# Altium PCB Studio_Clock_hv1.01_PCB_240215a.PcbDoc (part 1 of 5)
Units mm, origin at the board's own origin, x right, y up, seen from the top; angles counter-clockwise.
Board outline 360 x 60 mm, 4 copper layers (TOP, PWR, GND, BOTTOM), stack 0.547 mm thick; 257 components, 289 nets, 969 pads, 664 vias.
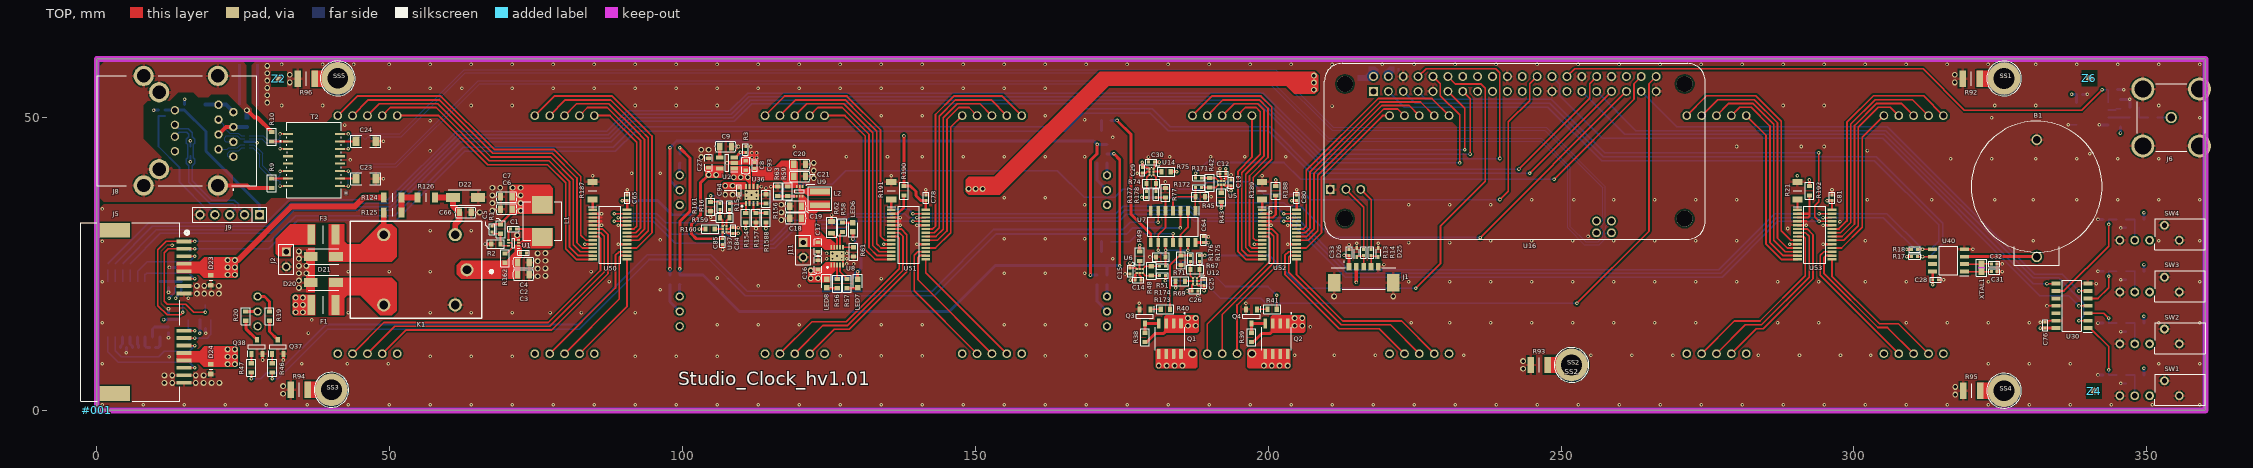
[diagram p0: TOP view]
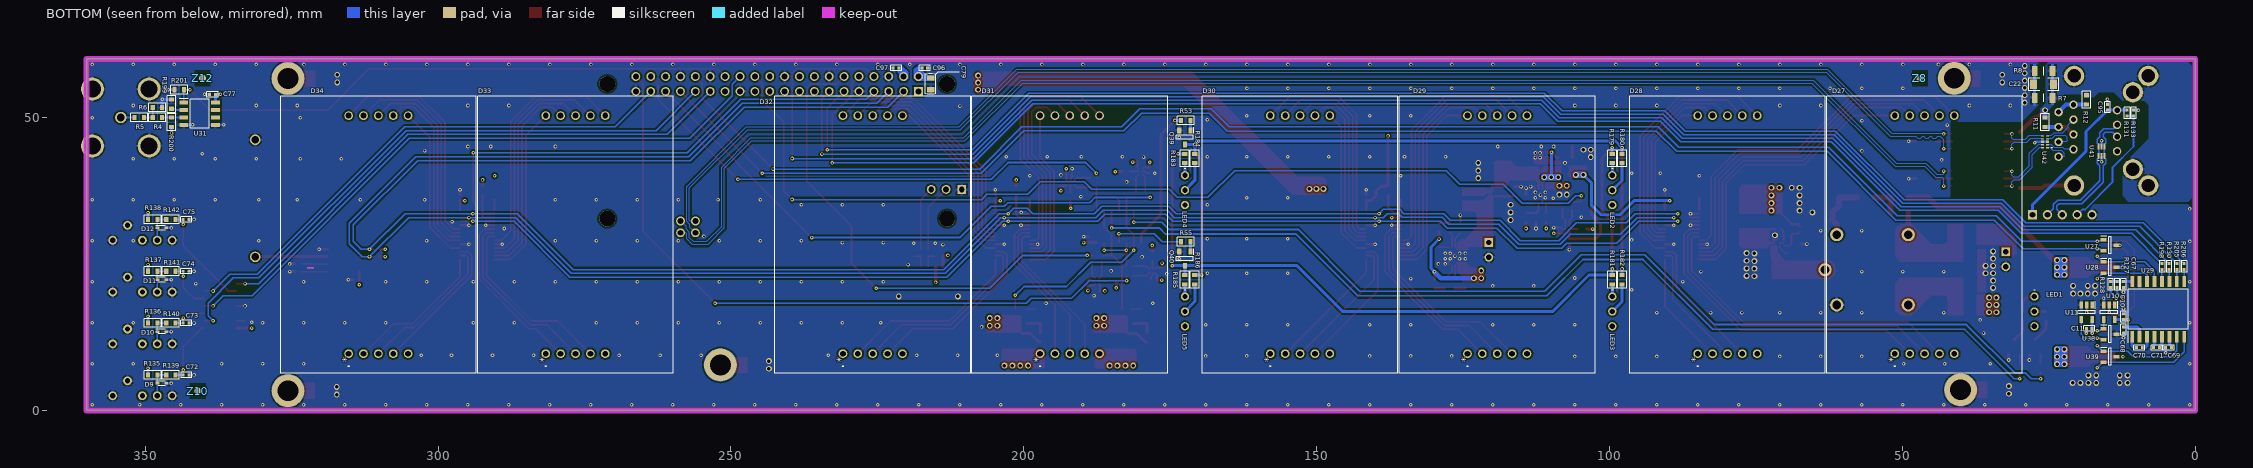
[diagram p1: BOTTOM view, seen from below]
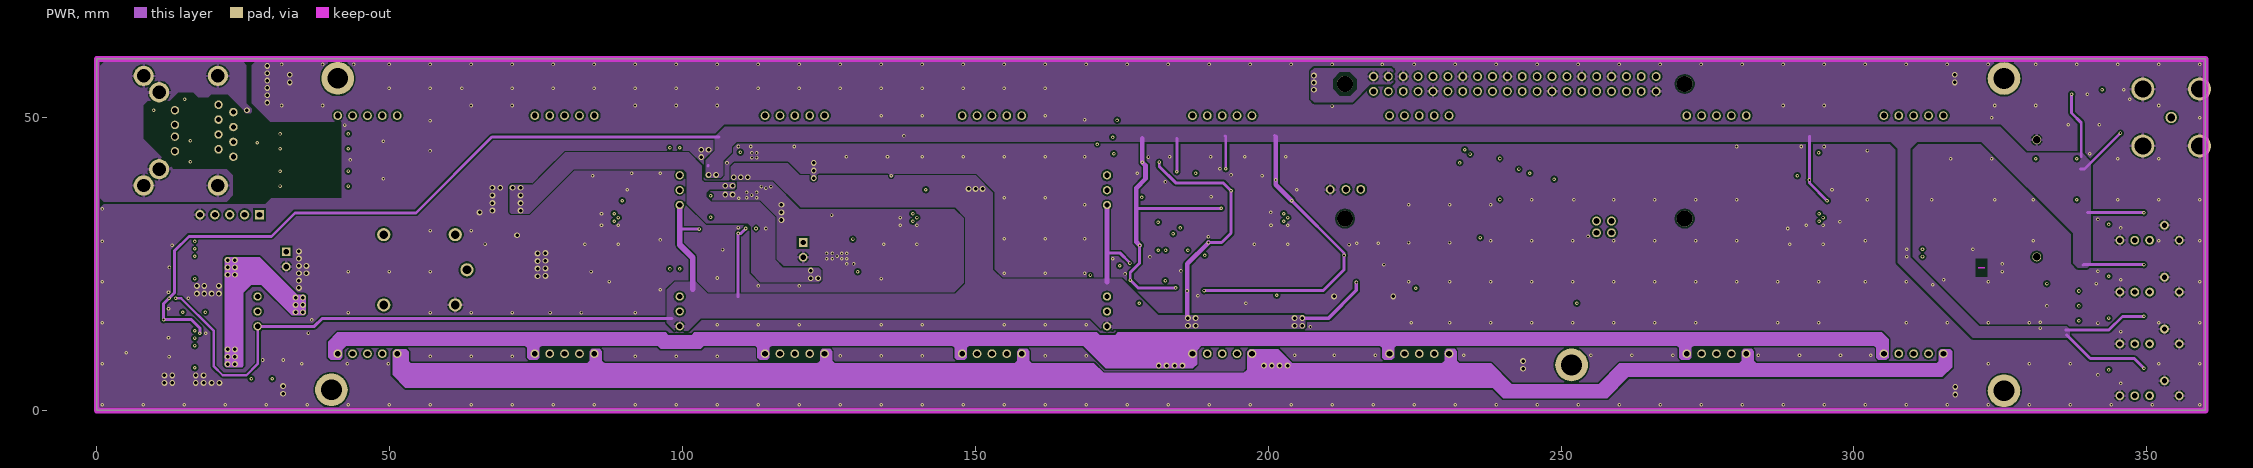
[diagram p2: PWR]
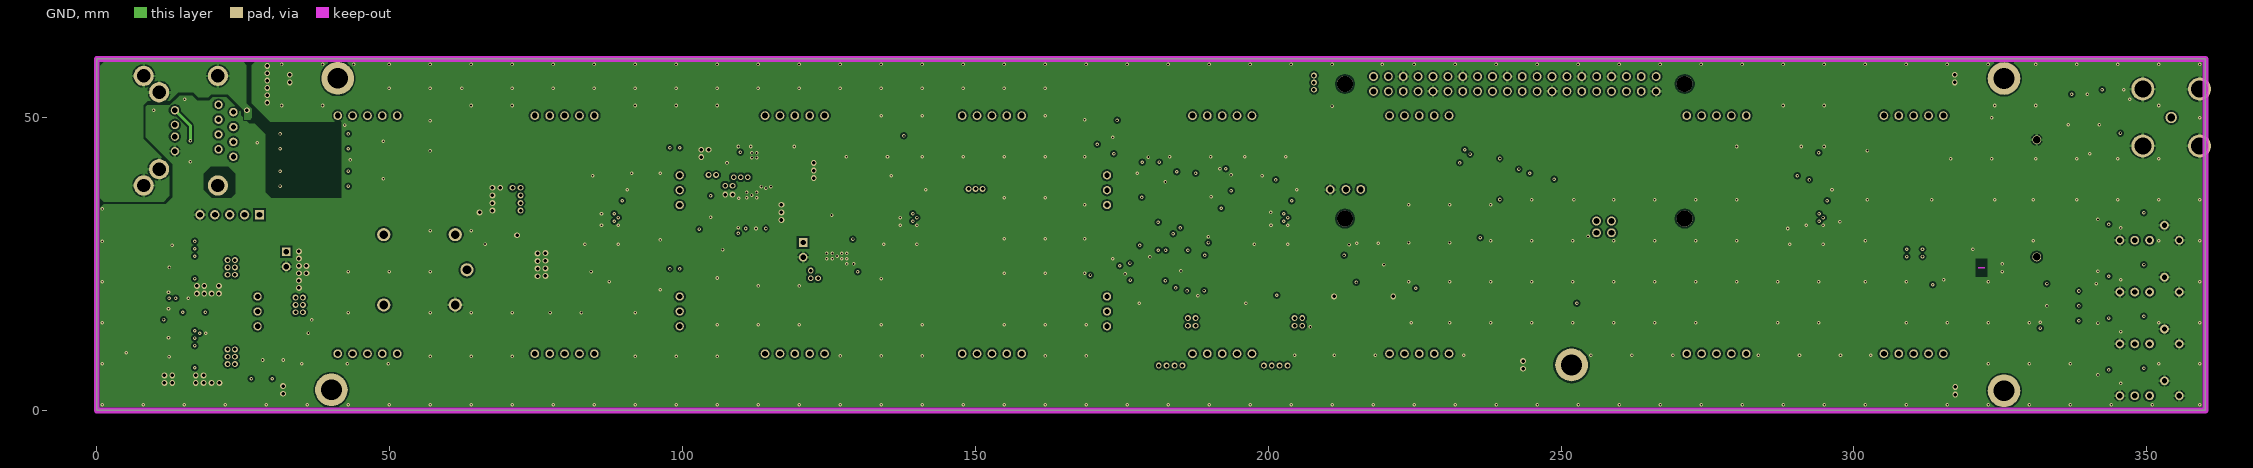
[diagram p3: GND]

## Layer stack, top to bottom
Top Solder: solder mask 0.0102, Solder Resist, Dk 3.5
TOP: signal copper 0.04
Dielectric 1: core 0.1016, FR-4, Dk 4.5
PWR: signal copper 0.0305
Dielectric2: core 0.2032, FR-4, Dk 4.5
GND: signal copper 0.0305
Dielectric3: core 0.1016, FR-4, Dk 4.5
BOTTOM: signal copper 0.04
Bottom Solder: solder mask 0.0102, Solder Resist, Dk 3.5

## Board outline
0,0 0,60 360,60 360,0

## Design rules (kind name [scope] priority, off if disabled: settings)
Clearance "SMD Pad1- SMD Pad1" [IsPad And ((PadXSize_TopLayer = AsMM(0.9906)) Or (PadYSize_TopLayer = AsMM(1.1684))) vs IsPad And ((PadXSize_TopLayer = AsMM(0.9906)) Or (PadYSize_TopLayer = AsMM(1.1684)))] p1: gap=0.127 ignorepadtopadclearanceinfootprint=FALSE
Clearance "SMD Pad-0.35track" [IsPad And ((PadXSize_TopLayer = AsMM(0.425)) Or (PadYSize_TopLayer = AsMM(0.13))) vs IsTrack And ((Width = AsMM(0.35)) Or (Width = AsMM(0.3)))] p2: gap=0.11 ignorepadtopadclearanceinfootprint=FALSE
Clearance "SMD Pad- SMD Pad" [IsPad And ((PadXSize_TopLayer = AsMM(0.425)) Or (PadYSize_TopLayer = AsMM(0.13))) vs IsPad And ((PadXSize_TopLayer = AsMM(0.425)) Or (PadYSize_TopLayer = AsMM(0.13)))] p3: gap=0.07 ignorepadtopadclearanceinfootprint=FALSE
Clearance keeput [IsKeepOut] p4: gap=0.001 ignorepadtopadclearanceinfootprint=FALSE except(0: Arc-Hole Track-Hole SMDPad-Hole THPad-Hole Via-Hole Fill-Hole Poly-Hole Region-Hole Text-Hole)
Clearance poly [All vs (InPolygon)] p5: gap=0.3 ignorepadtopadclearanceinfootprint=FALSE except(0: Arc-Hole Track-Hole SMDPad-Hole THPad-Hole Via-Hole Fill-Hole Poly-Hole Region-Hole Text-Hole)
Clearance via-overlap [(IsVia) vs (IsVia)] p6: gap=0.1 ignorepadtopadclearanceinfootprint=FALSE except(0: Arc-Hole Track-Hole SMDPad-Hole THPad-Hole Via-Hole Fill-Hole Poly-Hole Region-Hole Text-Hole)
Clearance via0.5down [(ObjectKind = 'Via') And (ViaDiameter < AsMM(0.5)) vs (ObjectKind = 'Pad') or ((ObjectKind = 'Track') And ((Layer = 'Top Layer') or (Layer = 'Bottom Layer')))] p7: gap=0.11 ignorepadtopadclearanceinfootprint=FALSE except(0: Arc-Hole Track-Hole SMDPad-Hole THPad-Hole Via-Hole Fill-Hole Poly-Hole Region-Hole Text-Hole)
Clearance via0.5down-mid [(ObjectKind = 'Via') And (ViaDiameter < AsMM(0.5)) vs (ObjectKind = 'Track') And OnMid] p8: gap=0.097 ignorepadtopadclearanceinfootprint=FALSE except(0: Arc-Hole Track-Hole SMDPad-Hole THPad-Hole Via-Hole Fill-Hole Poly-Hole Region-Hole Text-Hole)
Clearance via0.6down [(ObjectKind = 'Via') And (ViaDiameter < AsMM(0.6))  And (ViaDiameter >= AsMM(0.5)) vs (ObjectKind = 'Pad') or ((ObjectKind = 'Track') And ((Layer = 'Top Layer') or (Layer = 'Bottom Layer')))] p9: gap=0.15 ignorepadtopadclearanceinfootprint=FALSE except(0: Arc-Hole Track-Hole SMDPad-Hole THPad-Hole Via-Hole Fill-Hole Poly-Hole Region-Hole Text-Hole)
Clearance via0.6down-mid [(ObjectKind = 'Via') And (ViaDiameter < AsMM(0.6))  And (ViaDiameter >= AsMM(0.5)) vs (ObjectKind = 'Track') And OnMid] p10: gap=0.075 ignorepadtopadclearanceinfootprint=FALSE except(0: Arc-Hole Track-Hole SMDPad-Hole THPad-Hole Via-Hole Fill-Hole Poly-Hole Region-Hole Text-Hole)
Clearance pad-necktrack [(ObjectKind = 'Pad') or ((ObjectKind = 'Track') And (Width = AsMM(0.103))) vs (ObjectKind = 'Track') And (Width = AsMM(0.103))] p11: gap=0.12 ignorepadtopadclearanceinfootprint=FALSE except(0: Arc-Hole Track-Hole SMDPad-Hole THPad-Hole Via-Hole Fill-Hole Poly-Hole Region-Hole Text-Hole)
Clearance pad-track [(ObjectKind = 'Pad') vs (ObjectKind = 'Track')] p12: gap=0.15 ignorepadtopadclearanceinfootprint=FALSE except(0: Arc-Hole Track-Hole SMDPad-Hole THPad-Hole Via-Hole Fill-Hole Poly-Hole Region-Hole Text-Hole)
Clearance track-track [(ObjectKind = 'Track') vs (ObjectKind = 'Track')] p13: gap=0.15 ignorepadtopadclearanceinfootprint=FALSE except(0: Arc-Hole Track-Hole SMDPad-Hole THPad-Hole Via-Hole Fill-Hole Poly-Hole Region-Hole Text-Hole)
Clearance all [All] p14: gap=0.15 ignorepadtopadclearanceinfootprint=FALSE except(0: Arc-Hole Track-Hole SMDPad-Hole THPad-Hole Via-Hole Fill-Hole Poly-Hole Region-Hole Text-Hole)
ComponentClearance [All] p1 off: gap=0.254 collisioncheckmode=3 verticalgap=0.254 showdistances=FALSE
DiffPairsRouting [All] p1 off: maxlimit=0.254 minlimit=0.254 mostfreqgap=0.254 toplayer_minwidth=0.381 toplayer_maxwidth=0.381 toplayer_prefwidth=0.381 midlayer1_minwidth=0.381 midlayer1_maxwidth=0.381 midlayer1_prefwidth=0.381 midlayer2_minwidth=0.381 midlayer2_maxwidth=0.381 midlayer2_prefwidth=0.381 bottomlayer_minwidth=0.381 bottomlayer_maxwidth=0.381 bottomlayer_prefwidth=0.381 maxuncoupledlength=12.7
Height [All] p1 off: minheight=0 maxheight=25.4 prefheight=12.7
HoleSize [All] p1: absolutevalues=TRUE maxlimit=10 minlimit=0.1 maxpercent=80.000 minpercent=20.000
MinimumSolderMaskSliver [All] p1: minsoldermaskwidth=0.1
PlaneClearance 0.25down [(HoleSize< AsMM(0.25))] p1: clearance=0.225
PlaneClearance 0.3down [(HoleSize >= AsMM(0.25)) and (HoleSize < AsMM(0.3))] p2: clearance=0.275
PlaneClearance 0.4down [(HoleSize >= AsMM(0.3)) and (HoleSize < AsMM(0.4))] p3: clearance=0.3
PlaneClearance 0.6down [(HoleSize >= AsMM(0.4)) and (HoleSize < AsMM(0.6))] p4: clearance=0.35
PlaneClearance 0.6up [(HoleSize >= AsMM(0.6))] p5: clearance=0.5
PlaneConnect Pad-relief [IsPad And not(InPadClass('Plan-direct'))] p1: planeconnectstyle=Relief reliefexpansion=0.5 reliefentries=4 reliefconductorwidth=0.5 reliefairgap=0.3
PlaneConnect Pad-direct [IsPad And InPadClass('Plan-direct')] p2: planeconnectstyle=Direct reliefexpansion=0.508 reliefentries=4 reliefconductorwidth=0.254 reliefairgap=0.254
PlaneConnect [(ObjectKind <> 'Pad')] p3: planeconnectstyle=Direct reliefexpansion=0.508 reliefentries=4 reliefconductorwidth=0.254 reliefairgap=0.254
PolygonConnect Poly-relief [IsPad And (not(InPadClass('Poly-direct')) )] p1: connectstyle=Relief reliefconductorwidth=0.5 reliefentries=4 polygonreliefangle="90 Angle" airgapwidth=0.254
PolygonConnect Poly-direct [IsPad And InPadClass('Poly-direct')] p2: connectstyle=Direct reliefconductorwidth=0.254 reliefentries=4 polygonreliefangle="90 Angle" airgapwidth=0.254
PolygonConnect [(ObjectKind <> 'Pad')] p3: connectstyle=Direct reliefconductorwidth=0.254 reliefentries=4 polygonreliefangle="90 Angle" airgapwidth=0.254
RoutingVias [All] p1: holewidth=0.6 width=0.6 viastyle="Through Hole" minholewidth=0.15 minwidth=0.45 maxholewidth=0.6 maxwidth=1
ShortCircuit NoNetPad [(Not IsElectrical) And (IsTrack  Or  IsPad Or IsVia) vs (Not IsElectrical) And (IsTrack  Or  IsPad Or IsVia)] p1: allowed=FALSE
ShortCircuit [InNetClass('All Nets') vs InNetClass('All Nets')] p2: allowed=FALSE
SilkToSilkClearance [All] p1: silktosilkclearance=0.1
SilkToSolderMaskClearance SilkscreenOverComponentPads [IsPad] p1: minsilkscreentomaskgap=0.1 clearancetoexposedcopper=TRUE
SolderMaskExpansion [All] p1: expansion=0.05 istentingtop=FALSE
Width [All] p1: maxlimit=10 minlimit=0.07 preferedwidth=0.15
20 further rules are at their usual default settings.

## Classes and differential pairs
component class "VIDEO INTERFACE": C77 J6 R4 R5 R6 R199 R200 R201 U31
component class SWITCH: C72 C73 C74 C75 C76 D9 D10 D11 D12 R135 R136 R137 R138 R139 R140 R141 R142 SW1 SW2 SW3 SW4 U30
component class RTC: B1 C28 C31 C32 R17 R18 U40 XTAL1
component class Q_LIGHT_CTRL1: C10 C11 C67 C68 C69 C70 C71 D23 D24 J5 R127 R128 R130 R198 R205 R206 U10 U11 U27 U28 U29 U38 U39
component class "POWER SUPPLY": C1 C2 C3 C4 C5 C6 C7 C8 C9 C27 C66 C84 C85 D20 D21 D22 F1 F3 J2 K1 L1 R1 R2 R3 R15 R16 R124 R125 R126 R159 R160 R161 R162 U1 U2 U37
component class PD_BUCK1: R92 R93 R94 R95 R96 SS1 SS2 SS3 SS4 SS5
component class MP_CTRL1: C22 C23 C24 C33 C79 C95 C96 C97 D25 D26 J1 J8 J9 R7 R8 R9 R10 R11 R12 R13 R14 R131 R133 T2 U16 U41 U42
component class "BACKUP Power": C16 C17 C18 C19 C20 C21 C93 C94 J11 L2 LED6 LED7 LED8 R56 R57 R58 R59 R61 R62 R63 R154 R156 R157 R1588 U8 U9 U36
component class AM_PM_INDICATOR: C12 C13 C14 C15 C25 C26 C29 C30 C64 LED1 LED2 LED3 LED4 LED5 Q1 Q2 Q3 Q4 Q37 Q38 Q39 Q40 R19 R20 R38 R39 R40 R41 R42 R43 R45 R46 R47 R48 R49 R51 R53 R55 R67 R69 R71 R74 R75 R77 R171 R172 R173 R174 R175 R176 R177 R178 R179 R180 R181 R182 R183 R184 R185 R186 U5 U6 U7 U12 U14
component class "7 SEGMENT DISPLAY": C65 C78 C80 C81 D27 D28 D29 D30 D31 D32 D33 D34 R21 R187 R188 R189 R190 R191 R192 U50 U51 U52 U53
differential pair USB_D: +USB_D_P -USB_D_N
differential pair TX: +TX_P -TX_N
differential pair RX: +RX_P -RX_N
differential pair ETX: +ETX_P -ETX_N
differential pair ERX: +ERX_P -ERX_N

## Components (designator, comment, footprint, x,y, rotation, side; value= is the part's Value field where it differs from the comment)
#001 "" KIJYUN 0,0 r0 top
B1 "BH-25C-1" BH-25C-1_ADM 331.2,46.19 r0 top
C1 "04023C104KAT2A" CAPC100x50x50L25 71.15,30.95 r180 top
C2 "CC0805KKX5R8BB106" CAPC200X125X125L50 72.85,25.25 r180 top
C3 "CC0805KKX5R8BB106" CAPC200X125X125L50 72.85,23.15 r180 top
C4 "04023C104KAT2A" CAPC100x50x50L25 72.85,26.9 r0 top
C5 "CC0402JRNPO9BN220" CAPC100x50x50L25 67.5,30.95 r270 top
C6 "GRT21BR61E226ME13L" CAPC200X125X125L50 69.95,34.35 r0 top
C7 "GRT21BR61E226ME13L" CAPC200X125X125L50 69.95,36.45 r0 top
C8 "0603YD105KAT2A" CAPC160X80X90L35 110.8,41.8 r270 top
C9 "CC0805KRX7R9BB223" CAPC200X125X125L50 107.35,45.05 r180 top
C10 "04023C104KAT2A" CAPC100x50x50L25 12.25,16 r90 bottom
C11 "04023C104KAT2A" CAPC100x50x50L25 18.1,14 r0 bottom
C12 "04023C104KAT2A" CAPC100x50x50L25 192.25,40.4 r0 top
C13 "04023C104KAT2A" CAPC100x50x50L25 193.65,38.85 r270 top
C14 "04023C104KAT2A" CAPC100x50x50L25 177.8,22.25 r180 top
C15 "04023C104KAT2A" CAPC100x50x50L25 176.4,23.8 r90 top
C16 "KGM15AR71C105KT" CAPC160X80X90L35 123.15,24.85 r270 top
C17 "KGM15AR71C105KT" CAPC160X80X90L35 123.15,27.9 r90 top
C18 "CC0805KKX5R8BB106" CAPC200X125X125L50 119.3,32.8 r0 top
C19 "CC0805KKX5R8BB106" CAPC200X125X125L50 119.3,34.85 r0 top
C20 "CC0805KKX5R8BB106" CAPC200X125X125L50 120,42 r180 top
C21 "CC0805KKX5R8BB106" CAPC200X125X125L50 120,39.95 r180 top
C22 "C1206C103K2REC7800" CAPC340180_140N_KEM 25.9,55.65 r0 bottom
C23 "C1206C103K2REC7800" CAPC340180_140N_KEM 45.95,39.55 r180 top
C24 "C1206C103K2REC7800" CAPC340180_140N_KEM 45.95,45.95 r180 top
C25 "04023C104KAT2A" CAPC100x50x50L25 189.05,21.8 r270 top
C26 "04023C104KAT2A" CAPC100x50x50L25 187.5,20.4 r180 top
C27 "0603YD105KAT2A" CAPC160X80X90L35 104.45,42.25 r270 top
C28 "04023C104KAT2A" CAPC100x50x50L25 313.95,22.3 r180 top
C29 "04023C104KAT2A" CAPC100x50x50L25 178.5,41 r90 top
C30 "04023C104KAT2A" CAPC100x50x50L25 180.05,42.4 r0 top
C31 "CBR04C120F5GAC" CAPC100x50x50L25 323.95,23.7 r180 top
C32 "CBR04C120F5GAC" CAPC100x50x50L25 323.95,25 r180 top
C33 "04023C104KAT2A" CAPC100x50x50L25 213.8,26.95 r270 top
C64 "04023C104KAT2A" CAPC100x50x50L25 188.95,29.15 r270 top
C65 "04023C104KAT2A" CAPC100x50x50L25 90.55,36.3 r90 top
C66 "" CAPC200X125X125L50 62.95,33.8 r180 top
C67 "CC0402KPX5R7BB105" CAPC100x50x50L25 12.25,21.5 r270 bottom
C68 "CC0402KPX5R7BB105" CAPC100x50x50L25 12.25,13.75 r90 bottom
C69 "CC0402KPX5R7BB105" CAPC100x50x50L25 4.55,10.7 r180 bottom
C70 "CC0402KPX5R7BB105" CAPC100x50x50L25 9.55,10.7 r180 bottom
C71 "CC0402KPX5R7BB105" CAPC100x50x50L25 6.6,10.7 r180 bottom
C72 "04023C104KAT2A" CAPC100x50x50L25 343,6.05 r0 bottom
C73 "04023C104KAT2A" CAPC100x50x50L25 343,14.9 r0 bottom
C74 "04023C104KAT2A" CAPC100x50x50L25 343,23.75 r0 bottom
C75 "04023C104KAT2A" CAPC100x50x50L25 343,32.6 r0 bottom
C76 "04023C104KAT2A" CAPC100x50x50L25 332.65,14.55 r270 top
C77 "04023C104KAT2A" CAPC100x50x50L25 338.5,53.95 r180 bottom
C78 "04023C104KAT2A" CAPC100x50x50L25 141.55,36.3 r90 top
C79 "0805W106K250CC" CAPC200X125X125L50 215.9,55.75 r90 bottom
C80 "04023C104KAT2A" CAPC100x50x50L25 204.85,36.3 r90 top
C81 "04023C104KAT2A" CAPC100x50x50L25 296.25,36.3 r90 top
C84 "DNP" CAPC100x50x50L25 108.65,30.7 r270 top
C85 "DNP" CAPC100x50x50L25 106.85,28.8 r90 top
C93 "04023C104KAT2A" CAPC100x50x50L25 112.3,41.8 r90 top
C94 "04023C104KAT2A" CAPC100x50x50L25 109.6,37.55 r270 top
C95 "04023C104KAT2A" CAPC100x50x50L25 15,51.75 r270 bottom
C96 "04023C104KAT2A" CAPC100x50x50L25 216.9,58.45 r0 bottom
C97 "04023C104KAT2A" CAPC100x50x50L25 221.8,58.45 r180 bottom
D9 "ESD5Z3.3T1" SOD-523 347.15,4.6 r180 bottom
D10 "ESD5Z3.3T1" SOD-523 347.15,13.45 r180 bottom
D11 "ESD5Z3.3T1" SOD-523 347.15,22.3 r180 bottom
D12 "ESD5Z3.3T1" SOD-523 347.15,31.15 r180 bottom
D20 "SMAJ14CA-13-F" SMA 38.7,21.8 r0 top
D21 "SMAJ14CA-13-F" SMA 38.7,26.25 r0 top
D22 "GS1M-LTP" DIOM520X260X290XL115X145 62.95,36.35 r0 top
D23 "82356120100" DIONC1608X90N 19.5,22.2 r270 top
D24 "82356120100" DIONC1608X90N 19.5,7.05 r270 top
D25 "ESD5Z" SOD-523 218.8,26.95 r90 top
D26 "ESD5Z" SOD-523 215.1,26.95 r90 top
D27 "KEM-15012-BSRSG" 7SEG_1.5inch 46.214,30 r90 bottom locked
D28 "KEM-15012-BSRSG" 7SEG_1.5inch 79.869,30 r90 bottom locked
D29 "KEM-15012-BSRSG" 7SEG_1.5inch 119.174,30 r90 bottom locked
D30 "KEM-15012-BSRSG" 7SEG_1.5inch 152.829,30 r90 bottom locked
D31 "KEM-15012-BSRSG" 7SEG_1.5inch 192.14,30 r90 bottom locked
D32 "KEM-15012-BSRSG" 7SEG_1.5inch 225.795,30 r90 bottom locked
D33 "KEM-15012-BSRSG" 7SEG_1.5inch 276.53,30 r90 bottom locked
D34 "KEM-15012-BSRSG" 7SEG_1.5inch 310.185,30 r90 bottom locked
F1 "0ZCG0200AF2B" Fuse_1812_ZCG_BEL 38.7,18 r0 top
F3 "0ZCG0200AF2B" Fuse_1812_ZCG_BEL 38.7,30 r0 top
J1 "533980571" CON_533980571 216.3,24.35 r0 top
J2 "0022285024" PLS-02 32.35,25.8 r270 top
J5 "0441930003" 0441930003 14.9,28.85 r180 top locked
J6 "BNC7T-J-P-XX-RA-BH1" SAMTEC_BNC7T-J-P-XX-RA-BH1 354.158,50 r270 top locked
J8 "1-1775855-1" CONN12_1-1775855-1_TEC 15.67,47.74 r270 top locked
J9 "PLS_05" PLS-05 22.7,33.4 r180 top
J11 "0022285024" PLS-02 120.6,27.4 r270 top
K1 "G5LE-1 DC12" "RELAY_G5LE-1 DC5_OMR" 56.1,24 r180 top
L1 "74437349047" IND_7050-WE-LHMI_WRE 76.1,32.35 r90 top
L2 "XEL4030-101MEB" IND_XEL4030_3.2_COC 123.45,36.2 r270 top
LED1 "484759" LED_3mm_bicolor 27.461,19.431 r0 bottom locked
LED2 "484759" LED_3mm_bicolor 99.521,40.132 r0 bottom locked
LED3 "484759" LED_3mm_bicolor 99.521,19.431 r0 bottom locked
LED4 "484759" LED_3mm_bicolor 172.481,40.132 r0 bottom locked
LED5 "484759" LED_3mm_bicolor 172.481,19.431 r0 bottom locked
LED6 "150060GS75000" LED_0603(1608) 129.1,31.25 r90 top
LED7 "150060GS75000" LED_0603(1608) 129.9,21.65 r270 top
LED8 "150060GS75000" LED_0603(1608) 124.6,21.65 r270 top
Q1 "SI4427BDY-T1-E3" SOIC8_127P600X175-8N 183.2,12.25 r270 top
Q2 "SI4427BDY-T1-E3" SOIC8_127P600X175-8N 201.4,12.25 r270 top
Q3 "MMBT3904-TP" SOT-23_MCC 178.95,16.05 r270 top
Q4 "MMBT3904-TP" SOT-23_MCC 197.15,16.05 r270 top
Q37 "MMBT3904-TP" SOT-23_MCC 30.9,10.85 r90 top
Q38 "MMBT3904-TP" SOT-23_MCC 27.35,10.85 r90 top
Q39 "MMBT3904-TP" SOT-23_MCC 172.5,46.6 r270 bottom
Q40 "MMBT3904-TP" SOT-23_MCC 172.5,25.9 r270 bottom
R1 "RC0603FR-0752K3L" RESC160X80X55L30 68.95,30.95 r90 top
R2 "RC0603FR-0710KL" RESC160X80X55L30 68.15,28.4 r0 top
R3 "DNP" RESC100X50X40L25 110.8,44.55 r270 top
R4 "RC0603FR-0715KL" RESC160X80X55L30 347.9,50 r180 bottom
R5 "RC0603FR-0733KL" RESC160X80X55L30 351,50 r0 bottom
R6 "RC0603FR-0733KL" RESC160X80X55L30 347.9,51.7 r0 bottom
R7 "RC1206JR-070RL" RESC3116X06N 25.9,53.35 r0 bottom
R8 "RC1206JR-070RL" RESC3116X06N 25.9,57.95 r0 bottom
R9 "RC0603FR-0775RP" RESC160X80X55L30 29.9,38.775 r90 top
R10 "RC0603FR-0775RP" RESC160X80X55L30 29.9,46.7 r270 top
R11 "RC0603FR-0775RP" RESC160X80X55L30 25.65,49.2 r270 bottom
R12 "RC0603FR-0775RP" RESC160X80X55L30 18.55,53 r270 bottom
R13 "RC0402FR-0733RL" RESC100X50X40L25 216.3,26.95 r90 top
R14 "RC0402FR-0733RL" RESC100X50X40L25 217.55,26.95 r90 top
R15 "RC0402FR-0733RL" RESC100X50X40L25 108,34.8 r90 top
R16 "RC0402FR-0733RL" RESC100X50X40L25 106.4,34.8 r270 top
R17 "RC0402FR-074K7L" RESC100X50X40L25 310.35,26.25 r180 top
R18 "RC0402FR-074K7L" RESC100X50X40L25 310.35,27.5 r180 top
R19 "RC0603JR-0791RL" RESC160X80X55L30 29.5,16.1 r270 top
R20 "RC0603JR-07150RL" RESC160X80X55L30 25.45,16.1 r270 top
R21 "RC1206FR-10910RL" RESC3116X06N 290.35,37.5 r270 top
R38 "RC0603FR-072K7L" RESC160X80X55L30 178.95,12.45 r270 top
R39 "RC0603FR-072K7L" RESC160X80X55L30 197.15,12.45 r270 top
R40 "RC0603FR-074K7L" RESC160X80X55L30 182.45,17.25 r0 top
R41 "RC0603FR-074K7L" RESC160X80X55L30 200.65,17.25 r0 top
R42 "DNP" RESC160X80X55L30 190,38.85 r90 top
R43 "RC0603JR-070RL" RESC160X80X55L30 192,36.35 r270 top
R45 "CRCW06035K60JNEA" RESC160X80X55L30 188.4,36.45 r180 top
R46 "RC0603FR-072K2L" RESC160X80X55L30 29.95,7.25 r90 top
R47 "RC0603FR-072K2L" RESC160X80X55L30 26.4,7.25 r270 top
R48 "DNP" RESC160X80X55L30 180.05,23.8 r270 top
R49 "RC0603JR-070RL" RESC160X80X55L30 178.05,26.3 r90 top
R51 "CRCW06035K60JNEA" RESC160X80X55L30 181.65,26.2 r0 top
R53 "RC0603FR-072K2L" RESC160X80X55L30 172.35,49.5 r180 bottom
R55 "RC0603FR-072K2L" RESC160X80X55L30 172.35,28.8 r180 bottom
R56 "RC0603FR-07470RL" RESC160X80X55L30 126.4,21.65 r270 top
R57 "RC0603FR-07470RL" RESC160X80X55L30 128.1,21.65 r270 top
R58 "RC0603FR-07470RL" RESC160X80X55L30 127.3,31.25 r90 top
R59 "RC0603FR-07732KL" RESC160X80X55L30 117.95,37.4 r270 top
R61 "RC0603FR-071KL" RESC160X80X55L30 129.2,27.05 r270 top
R62 "NTCS0805E3103HMT" RESC200X125X60L40 125.45,31.25 r270 top
R63 "RC0603FR-07100KL" RESC160X80X55L30 116.25,37.4 r90 top
R67 "RC0603JR-070RL" RESC160X80X55L30 187.5,24.05 r0 top
R69 "RC0603JR-070RL" RESC160X80X55L30 185,22.05 r180 top
R71 "CRCW06035K60JNEA" RESC160X80X55L30 185.1,25.65 r90 top
R74 "DNP" RESC160X80X55L30 180.05,38.75 r180 top
R75 "RC0603JR-070RL" RESC160X80X55L30 182.55,40.75 r0 top
R77 "CRCW06035K60JNEA" RESC160X80X55L30 182.45,37.15 r270 top
R92 "0" R_SM_1210 320,56.65 r0 top
R93 "0" R_SM_1210 246.3,7.75 r0 top
R94 "0" R_SM_1210 34.6,3.5 r0 top
R95 "0" R_SM_1210 320.1,3.35 r0 top
R96 "0" R_SM_1210 35.75,56.65 r0 top
R124 "RC1206JR-070RL" RESC3116X06N 50.5,36.35 r180 top
R125 "RC1206JR-070RL" RESC3116X06N 50.5,33.8 r180 top
R126 "RC1206JR-07330RL" RESC3116X06N 56.25,36.35 r0 top
R127 "DNP" RESC100X50X40L25 13.35,21.5 r270 bottom
R128 "AC0402JR-070RL" RESC100X50X40L25 14.45,21.5 r270 bottom
R130 "RC0402FR-0733RL" RESC100X50X40L25 4.45,24.55 r270 bottom
R131 "DNP" RESC100X50X40L25 11.65,50.75 r90 bottom
R133 "AC0402JR-070RL" RESC100X50X40L25 10.55,50.75 r270 bottom
R135 "RC0603FR-0710KL" RESC160X80X55L30 348.7,6.05 r0 bottom
R136 "RC0603FR-0710KL" RESC160X80X55L30 348.7,14.9 r0 bottom
R137 "RC0603FR-0710KL" RESC160X80X55L30 348.7,23.75 r0 bottom
R138 "RC0603FR-0710KL" RESC160X80X55L30 348.7,32.6 r0 bottom
R139 "RC0603FR-0710KL" RESC160X80X55L30 345.6,6.05 r180 bottom
R140 "RC0603FR-0710KL" RESC160X80X55L30 345.6,14.9 r180 bottom
R141 "RC0603FR-0710KL" RESC160X80X55L30 345.6,23.75 r180 bottom
R142 "RC0603FR-0710KL" RESC160X80X55L30 345.6,32.6 r180 bottom
R154 "RC0603FR-071KL" RESC160X80X55L30 110.8,32.9 r270 top
R156 "RC0603FR-07402RP" RESC160X80X55L30 114.25,36.1 r90 top
R157 "RC0603FR-0710KL" RESC160X80X55L30 112.55,32.9 r270 top
R159 "RC0603FR-0710KL" RESC160X80X55L30 107.2,32.9 r0 top
R160 "DNP" RESC160X80X55L30 104.7,30.95 r180 top
R161 "CRCW06035K60JNEA" RESC160X80X55L30 104.8,34.8 r90 top
R162 "RC0603FR-0710KL" RESC160X80X55L30 69.7,26 r90 top
R171 "RC0402FR-0733RL" RESC100X50X40L25 188.1,39.65 r180 top
R172 "RC0402FR-0733RL" RESC100X50X40L25 188.1,38.05 r0 top
R173 "RC0402FR-0733RL" RESC100X50X40L25 181.95,23 r0 top
R174 "RC0402FR-0733RL" RESC100X50X40L25 181.95,24.6 r180 top
R175 "RC0402FR-0733RL" RESC100X50X40L25 188.3,25.95 r90 top
R176 "RC0402FR-0733RL" RESC100X50X40L25 186.7,25.95 r270 top
R177 "RC0402FR-0733RL" RESC100X50X40L25 179.25,36.85 r270 top
R178 "RC0402FR-0733RL" RESC100X50X40L25 180.85,36.85 r90 top
R179 "RC0603JR-0791RL" RESC160X80X55L30 99.55,43 r90 bottom
R180 "RC0603JR-07150RL" RESC160X80X55L30 97.85,43 r90 bottom
R181 "RC0603JR-0791RL" RESC160X80X55L30 99.55,22.3 r90 bottom
R182 "RC0603JR-07150RL" RESC160X80X55L30 97.85,22.3 r90 bottom
R183 "RC0603JR-0791RL" RESC160X80X55L30 172.5,43 r90 bottom
R184 "RC0603JR-07150RL" RESC160X80X55L30 170.8,43 r90 bottom
R185 "RC0603JR-0791RL" RESC160X80X55L30 172.5,22.3 r90 bottom
R186 "RC0603JR-07150RL" RESC160X80X55L30 170.8,22.3 r90 bottom
R187 "RC1206FR-10910RL" RESC3116X06N 84.65,37.5 r270 top
R188 "RC0603FR-0710KL" RESC160X80X55L30 201.3,37.5 r90 top
R189 "RC1206FR-10910RL" RESC3116X06N 198.95,37.5 r270 top
R190 "RC0603FR-0710KL" RESC160X80X55L30 137.8,37.5 r90 top
R191 "RC1206FR-10910RL" RESC3116X06N 135.65,37.5 r270 top
R192 "RC0603FR-0710KL" RESC160X80X55L30 292.4,37.5 r90 top
R198 "RC0402FR-0733RL" RESC100X50X40L25 5.7,24.55 r90 bottom
R199 "RC0603FR-07100KL" RESC160X80X55L30 345.5,52.3 r270 bottom
R200 "RC0603FR-07100KL" RESC160X80X55L30 345.5,49.2 r90 bottom
R201 "RC0603FR-0751KP" RESC160X80X55L30 344.2,54.75 r0 bottom
R205 "RC0402FR-0733RL" RESC100X50X40L25 3.15,24.55 r90 bottom
R206 "RC0402FR-0733RL" RESC100X50X40L25 1.9,24.55 r90 bottom
R1588 "RC0603FR-0732K4L" RESC160X80X55L30 114.25,32.9 r90 top
SS1 "SPACER" SPACER_139T 325.614,56.661 r0 top locked
SS2 "SPACER" SPACER_139T 251.79,7.76 r0 top locked
SS3 "SPACER" SPACER_139T 40.065,3.51 r0 top locked
SS4 "SPACER" SPACER_139T 325.614,3.36 r0 top locked
SS5 "SPACER" SPACER_139T 41.134,56.68 r0 top locked
SW1 "AB15AV-FA" AB15AV-FA 355.55,3.5 r90 top
SW2 "AB15AV-FA" AB15AV-FA 355.55,12.35 r90 top
SW3 "AB15AV-FA" AB15AV-FA 355.55,21.2 r90 top
SW4 "AB15AV-FA" AB15AV-FA 355.55,30.05 r90 top
T2 "HX1188FNL" SOIC16_HX1188_PUL 37.1,42.75 r180 top
U1 "TPS562207DRLR" DRL0006A 71.15,28.6 r180 top
U2 "RT9193-33GB" SOT-23-5_RIT 107.6,42.25 r180 top
U5 "74LVCH1T45GM,132" 74LVCH1T45_XSON6_NEX 192,38.85 r180 top
U6 "74LVCH1T45GM,132" 74LVCH1T45_XSON6_NEX 178.05,23.8 r0 top
U7 "74ACT08SC" SOIC14P127_865X600X175L83X41 183.75,31.35 r270 top
U8 "MCP73833T-AMI/MF" DFN10_3x3MC_MCH 126.4,26.35 r90 top
U9 "TPS61023DRLT" DRL0006A 120,37.4 r90 top
U10 "M74VHC1GT50DTT1G" SOP5P95_290X280X145L45X40 14.7,16.75 r270 bottom
U11 "M74VHC1GT50DTT1G" SOP5P95_290X280X145L45X40 18.55,16.75 r270 bottom
U12 "74LVCH1T45GM,132" 74LVCH1T45_XSON6_NEX 187.5,22.05 r90 top
U14 "74LVCH1T45GM,132" 74LVCH1T45_XSON6_NEX 180.05,40.75 r270 top
U16 "BPi-M2-Zero" BPi-M2-Zero 242.1,43.98 r0 top locked
U27 "PESD1CAN,215" SOT23_PESD1_NEX 14.55,28.2 r180 bottom
U28 "PESD1CAN,215" SOT23_PESD1_NEX 14.55,24.4 r180 bottom
U29 "MAX232DWG4" DW16 6.325,17.275 r90 bottom
U30 "MC74VHC14DG" SOIC14P127_865X600X175L83X41 337.2,17.85 r180 top
U31 "MCP602T-I/SN" SOIC8-N_MC_MCH 340.7,50.65 r180 bottom
U36 "TPS2113ADRBR" DRB8_2P4X1P65 111.8,36.75 r90 top
U37 "74LVCH1T45GM,132" 74LVCH1T45_XSON6_NEX 107.2,30.95 r90 top
U38 "PESD1CAN,215" SOT23_PESD1_NEX 14.55,13 r180 bottom
U39 "PESD1CAN,215" SOT23_PESD1_NEX 14.55,9.15 r180 bottom
U40 "DS1338Z-33+T&R" SOIC8P127_490X600X175L70X41 316.15,25.6 r180 top
U41 "USBLC6-2" SOT23-6 16,44.25 r180 bottom
U42 "ESD224DQAR" DQA0010A 25.65,45.85 r0 bottom
U50 "TLC59116ITPWRQ1" PW0028A_N 87.6,30 r0 top
U51 "TLC59116ITPWRQ1" PW0028A_N 138.6,30 r0 top
U52 "TLC59116ITPWRQ1" PW0028A_N 201.9,30 r0 top
U53 "TLC59116ITPWRQ1" PW0028A_N 293.3,30 r0 top
XTAL1 "FC2012AN 32.768K-90NN60KD7" XTAL_FC2012AN_EPS 321.75,24.35 r90 top
Z2 "Fiducial" REPER1.2 31.1,56.6 r0 top
Z4 "Fiducial" REPER1.2 341,3.3 r0 top (schematic designator Z2)
Z6 "Fiducial" REPER1.2 340.2,56.7 r0 top (schematic designator Z2)
Z8 "Fiducial" REPER1.2 47,56.7 r180 bottom (schematic designator Z4)
Z10 "Fiducial" REPER1.2 341,3.3 r180 bottom (schematic designator Z4)
Z12 "Fiducial" REPER1.2 340.2,56.7 r180 bottom (schematic designator Z4)

## Footprints (in the part's own frame and the unit in brackets; to place one, negate y for a bottom-side part, rotate by r counter-clockwise, add the part's x,y. Pads: shape width x height; smd on the part's side, far side on the other; paste and mask are expansions set on the pad)
7SEG_1.5inch [mil] "SA15-11SRWA_KNB"
  round 59 hole 39 mask+1.97: 1(-800,200) 2(-800,100) 3(-800,0) 4(-800,-100) 5(-800,-200) 6(800,-200) 7(800,-100) 8(800,0) 9(800,100) 10(800,200)
  silkscreen extent -930,-658 930,658, body extent -925,-653 925,653, height 492
74LVCH1T45_XSON6_NEX [mm]
  rect 0.425x0.37 smd paste+0 mask+0.05: 1(-0.5,-0.337) 2(0,-0.337) 3(0.5,-0.337) 4(0.5,0.337) 5(0,0.337) 6(-0.5,0.337)
  silkscreen extent -0.73,-0.75 0.73,0.05, body extent -0.72,-0.5 0.73,0.5, height 0.47
0441930003 [mm]
  rect 2.54x0.64 smd paste+0 mask+0.05: 1(0,0) 2(0,1.27) 3(0,2.54) 4(0,3.81) 5(0,5.08) 6(0,6.35) 7(0,7.62) 8(0,8.89) 9(0,15.24) 10(0,16.51) 11(0,17.78) 12(0,19.05) 13(0,20.32) 14(0,21.59) 15(0,22.86) 16(0,24.13)
  rect 5.21x2.54 smd paste+0 mask+0.05: 17(11.8,-1.9) 18(11.8,26)
  silkscreen extent -0.81,-3.2 17.6,27.3, body extent -0.72,-3.24 17.67,27.24, height 11.84
AB15AV-FA [mm]
  round 1.5 hole 0.9 paste-10 mask+0.05: 0(-1,0) 0(1.54,2.54) 1(-1,10.16) 2(-1,7.62) 3(-1,5.08)
  silkscreen extent -2.65,-4.45 2.65,4.23, body extent -3,-15.09 2.84,10.46, height 10.23
BH-25C-1_ADM [mil]
  round 71 / inner round 60 / far side round 71 hole 51 paste-393.7 mask+1.97: 1(0,0) 2(0,-787)
  silkscreen extent -440,-842 440,125
BPi-M2-Zero [mm] "ADA3708_RPI-ZERO"
  rect 1.508x1.508 / inner round 1.508 / far side rect 1.508x1.508 hole 1 paste-10 mask+0.05: 1(-24.13,10.48) 41(-31.5,-6.28)
  round 1.508 hole 1 paste-10 mask+0.05: 2(-24.13,13.02) 3(-21.59,10.48) 4(-21.59,13.02) 5(-19.05,10.48) 6(-19.05,13.02) 7(-16.51,10.48) 8(-16.51,13.02) 9(-13.97,10.48) 10(-13.97,13.02) 11(-11.43,10.48) 12(-11.43,13.02) 13(-8.89,10.48) 14(-8.89,13.02) 15(-6.35,10.48) 16(-6.35,13.02) 17(-3.81,10.48) 18(-3.81,13.02) 19(-1.27,10.48) 20(-1.27,13.02) 21(1.27,10.48) 22(1.27,13.02) 23(3.81,10.48) 24(3.81,13.02) 25(6.35,10.48) 26(6.35,13.02) 27(8.89,10.48) 28(8.89,13.02) 29(11.43,10.48) 30(11.43,13.02) 31(13.97,10.48) 32(13.97,13.02) 33(16.51,10.48) 34(16.51,13.02) 35(19.05,10.48) 36(19.05,13.02) 37(21.59,10.48) 38(21.59,13.02) 39(24.13,10.48) 40(24.13,13.02) 42(-28.84,-6.25) 43(-26.3,-6.25) 44(13.95,-11.65) 45(16.5,-11.65) 46(13.95,-13.65) 47(16.5,-13.65)
  round 2.75 hole 2.75 unplated paste-10 mask+0.05: ""(-29,-11.25) ""(-29,11.75) ""(29,-11.25) ""(29,11.75)
  silkscreen extent -32.5,-14.75 32.5,15.25, body extent -32.75,-15.5 32.75,15.5, height 3.81
CAPC100x50x50L25 [mm]
  rect 0.5x0.5 smd paste+0 mask+0.05: 1(-0.5,0) 2(0.5,0)
  silkscreen extent -0.95,-0.45 0.95,0.45, body extent -0.5,-0.25 0.5,0.25, height 0.56
CAPC160X80X90L35 [mm]
  rect 0.6x0.8 smd paste+0 mask+0.05: 1(-0.8,0) 2(0.8,0)
  silkscreen extent -1.4,-0.65 1.4,0.65, body extent -0.8,-0.4 0.8,0.4, height 0.8
CAPC200X125X125L50 [mm]
  rect 0.9x1.3 smd paste+0 mask+0.05: 1(-1,0) 2(1,0)
  round 0.2 on Mech4 paste+0 mask+0.05: ""(0,0)
  silkscreen extent -1.8,-0.9 1.8,0.9, body extent -1,-0.64 1,0.61, height 0.78
CAPC340180_140N_KEM [mm]
  rect 1.2x1.6 smd paste+0 mask+0.05: 1(-1.7,0) 2(1.7,0)
  round 0.2 on Mech4: ""(0,0)
  silkscreen extent -2.58,-1.05 2.58,1.05, body extent -2,-0.8 2,0.8, height 1.53
CON_533980571 [mm]
  rect 0.8x1.3 smd paste+0 mask+0.05: 1(-2.5,0.2) 2(-1.25,0.2) 3(0,0.2) 4(1.25,0.2) 5(2.5,0.2)
  rect 2.1x3 smd paste+0 mask+0.05: 6(-5.05,-2.55) 7(5.05,-2.55)
  silkscreen extent -5.5,-3.7 5.5,1.11, body extent -5.7,-3.71 5.7,0.49, height 4.74
CONN12_1-1775855-1_TEC [mm]
  round 1.446 hole 0.89 paste-10 mask+0.05: 1(4.445,7.66) 2(3.175,5.12) 3(1.905,7.66) 4(0.635,5.12) 5(-0.635,7.66) 6(-1.905,5.12) 7(-3.175,7.66) 8(-4.445,5.12)
  round 3.45 hole 2.3 paste-10 mask+0.05: 13(9.35,5.02) 14(-9.35,5.02) 15(9.35,-7.66) 16(6.57,-5.03) 17(-6.57,-5.03) 18(-9.35,-7.66)
  round 1.431 hole 0.92 paste-10 mask+0.05: A1(-3.5,-2.32) A2(-1,-2.32) A3(1,-2.32) A4(3.5,-2.32)
  silkscreen extent -9.35,-15.66 10.14,11.64, body extent -9.35,-15.65 9.35,11.65, height 22.5
DFN10_3x3MC_MCH [mm]
  rect 0.85x0.3 smd paste+0 mask+0.05: 1(-1.5,1) 2(-1.5,0.5) 3(-1.5,0) 4(-1.5,-0.5) 5(-1.5,-1) 6(1.5,-1) 7(1.5,-0.5) 8(1.5,0) 9(1.5,0.5) 10(1.5,1)
  rect 1.7x2.45 smd paste+0 mask+0.05: 11(0,0)
  silkscreen extent -2.05,1.52 -1.8,1.77, body extent -1.55,-1.5 1.55,1.5, height 1
DIOM520X260X290XL115X145 [mm]
  rect 2.35x1.55 smd paste+0 mask+0.05: 1(-2.15,0) 2(2.15,0)
  silkscreen extent -2.93,-1.29 2.6,1.29, body extent -2.7,-1.4 2.7,1.4, height 2.26
DIONC1608X90N [mm]
  rect 0.8x0.95 smd paste+0 mask+0.05: 1(-0.85,0) 2(0.85,0)
  silkscreen extent 0,-0.3 0,0.3, body extent -0.8,-0.4 0.8,0.4, height 0.9
DQA0010A [mm]
  rect 0.565x0.2 smd paste+0 mask+0.05: 1(-0.417,1) 2(-0.417,0.5) 4(-0.417,-0.5) 5(-0.417,-1) 6(0.417,-1) 7(0.417,-0.5) 9(0.417,0.5) 10(0.417,1)
  rect 0.565x0.4 smd paste+0 mask+0.05: 3(-0.417,0) 8(0.417,0)
  silkscreen extent -1.2,0.95 -1.1,1.05, body extent -0.5,-1.25 0.5,1.25, height 0.55
DRB8_2P4X1P65 [mm]
  rect 0.85x0.35 smd paste+0 mask+0.05: 1(-1.45,0.975) 2(-1.45,0.325) 3(-1.45,-0.325) 4(-1.45,-0.975) 5(1.45,-0.975) 6(1.45,-0.325) 7(1.45,0.325) 8(1.45,0.975)
  rect 1.7x2.45 smd paste+0 mask+0.05: 9(0,0)
  silkscreen extent -2,1.52 -1.75,1.77, body extent -1.5,-1.5 1.5,1.5, height 0.77
DRL0006A [mm]
  rect 0.475x0.3 smd paste+0 mask+0.05: 1(-0.838,0.5) 2(-0.838,0) 3(-0.838,-0.5) 4(0.838,-0.5) 5(0.838,0) 6(0.838,0.5)
  silkscreen extent -1.07,-0.8 0.25,0.9, body extent -0.8,-0.8 0.8,0.8, height 0.6
DW16 [mm]
  rect 1.95x0.65 smd paste+0 mask+0.05: 1(-4.725,4.445) 2(-4.725,3.175) 3(-4.725,1.905) 4(-4.725,0.635) 5(-4.725,-0.635) 6(-4.725,-1.905) 7(-4.725,-3.175) 8(-4.725,-4.445) 9(4.725,-4.445) 10(4.725,-3.175) 11(4.725,-1.905) 12(4.725,-0.635) 13(4.725,0.635) 14(4.725,1.905) 15(4.725,3.175) 16(4.725,4.445)
  silkscreen extent -5.7,-5.15 3.4,5.15, body extent -5.17,-5.15 5.17,5.15, height 2.59
Fuse_1812_ZCG_BEL [mm]
  rect 1.31x3.43 smd paste+0 mask+0.05: 1(-2.065,0) 2(2.065,0)
  silkscreen extent 0,-1.52 0,1.52, body extent -2.27,-1.62 2.27,1.62, height 1.55
IND_7050-WE-LHMI_WRE [mm]
  rect 3x3.5 smd paste+0 mask+0.05: 1(-2.75,0) 2(2.75,0)
  silkscreen extent -3.3,-3.3 3.3,3.3, body extent -3.65,-3.3 3.65,3.3, height 4.8
IND_XEL4030_3.2_COC [mm]
  rect 0.98x3.4 smd paste+0 mask+0.05: 1(-1.185,0) 2(1.185,0)
  silkscreen extent -2,-2 2,2, body extent -2,-2 2,2, height 3.3
KIJYUN [mm]
LED_3mm_bicolor [mm]
  round 1.416 hole 0.91 paste-10 mask+0.05: 1(0,0) 2(0,5.08) 3(0,2.54)
  silkscreen extent -0.05,-1.2 0.05,-1.1, body extent -1.95,-0.35 1.95,5.43, height 6.4
LED_0603(1608) [mm]
  rect 0.95x0.95 smd paste+0 mask+0.05: 1(-0.75,0) 2(0.75,0)
  silkscreen extent -1.58,-0.82 0.75,0.82, body extent -0.8,-0.4 0.8,0.4, height 0.7
PLS-02 [mm]
  rect 1.5x1.5 hole 0.9 paste-10 mask+0.05: 1(-1.27,0)
  round 1.5 hole 0.9 paste-10 mask+0.05: 2(1.27,0)
  silkscreen extent -2.54,-1.27 2.54,1.27, body extent -2.54,-1.26 2.54,1.28, height 8.68
PLS-05 [mm]
  rect 1.6x1.6 hole 1 paste-10 mask+0.05: 1(-5.08,0)
  round 1.6 hole 1 paste-10 mask+0.05: 2(-2.54,0) 3(0,0) 4(2.54,0) 5(5.08,0)
  silkscreen extent -6.35,-1.27 6.35,1.27, body extent -6.35,-1.26 6.35,1.28, height 8.68
PW0028A_N [mm]
  rect 1.475x0.4 smd paste+0 mask+0.05: 1(-2.938,4.225) 2(-2.938,3.575) 3(-2.938,2.925) 4(-2.938,2.275) 5(-2.938,1.625) 6(-2.938,0.975) 7(-2.938,0.325) 8(-2.938,-0.325) 9(-2.938,-0.975) 10(-2.938,-1.625) 11(-2.938,-2.275) 12(-2.938,-2.925) 13(-2.938,-3.575) 14(-2.938,-4.225) 15(2.938,-4.225) 16(2.938,-3.575) 17(2.938,-2.925) 18(2.938,-2.275) 19(2.938,-1.625) 20(2.938,-0.975) 21(2.938,-0.325) 22(2.938,0.325) 23(2.938,0.975) 24(2.938,1.625) 25(2.938,2.275) 26(2.938,2.925) 27(2.938,3.575) 28(2.938,4.225)
  silkscreen extent -3.67,-4.85 1.85,4.85, body extent -3.2,-4.85 3.2,4.85, height 1.08
R_SM_1210 [mm]
  rect 1.1x2.8 smd paste+0 mask+0.05: 1(-1.45,0) 2(1.45,0)
  silkscreen extent 0,-1.2 0,1.2, body extent -1.55,-1.3 1.55,1.3, height 0.65
"RELAY_G5LE-1 DC5_OMR" [mm]
  round 2.25 hole 1.5 paste-10 mask+0.05: 1(-7.1,0) 2(-5.1,-6) 3(7.1,-6) 4(7.1,6) 5(-5.1,6)
  silkscreen extent -11.51,-8.25 12.85,8.25, body extent -9.65,-8.25 12.85,8.25, height 18.5
REPER1.2 [mm]
  round 1.2 smd paste+0 mask+0.05: 1(0,0)
  TOP pour cut-out: -1.35,-1.325 1.325,-1.325 1.325,1.325 -1.35,1.325
RESC100X50X40L25 [mm]
  rect 0.5x0.5 smd paste+0 mask+0.05: 1(-0.5,0)
  rect 0.5x0.5 smd mask+0.05: 2(0.5,0)
  round 0.2 on Mech4: ""(0,0)
  silkscreen extent -0.97,-0.47 0.97,0.47, body extent -0.5,-0.25 0.5,0.25, height 0.3
RESC160X80X55L30 [mm]
  rect 0.7x0.9 smd paste+0 mask+0.05: 1(-0.8,0) 2(0.8,0)
  silkscreen extent -1.45,-0.75 1.45,0.75, body extent -0.77,-0.42 0.78,0.43, height 0.45
RESC200X125X60L40 [mm]
  rect 0.8x1.2 smd paste+0 mask+0.05: 1(-1,0) 2(1,0)
  silkscreen extent -1.7,-0.9 1.7,0.9, body extent -1,-0.62 1,0.63, height 0.45
RESC3116X06N [mm]
  rect 1x1.75 smd paste+0 mask+0.05: 1(-1.5,0) 2(1.5,0)
  silkscreen extent 0,-0.7 0,0.7, body extent -1.55,-0.8 1.55,0.8, height 0.65
SAMTEC_BNC7T-J-P-XX-RA-BH1 [mm]
  round 1.95 hole 1.3 paste-10 mask+0.05: 1(0,0)
  round 3.916 hole 2.9 paste-10 mask+0.05: 2(-4.85,4.85) 2(-4.85,-4.85) 2(4.85,4.85) 2(4.85,-4.85)
  silkscreen extent -5.8,-5.8 5.8,5.8, body extent -8,-5.8 8,26.95, height 19.3
SMA [mm]
  rect 2.35x1.55 smd paste+0 mask+0.05: 1(-2.15,0) 2(2.15,0)
  silkscreen extent -2.6,-1.3 2.6,1.3, body extent -2.6,-1.3 2.6,1.3, height 2.3
SOD-523 [mm]
  rect 0.64x0.42 smd paste+0 mask+0.05: 1(-0.75,0) 2(0.75,0)
  silkscreen extent -1.07,-0.4 0.6,0.4, body extent -0.8,-0.4 0.8,0.4, height 0.7
SOIC8-N_MC_MCH [mm]
  rect 1.5x0.65 smd paste+0 mask+0.05: 1(-2.7,1.905) 2(-2.7,0.635) 3(-2.7,-0.635) 4(-2.7,-1.905) 5(2.7,-1.905) 6(2.7,-0.635) 7(2.7,0.635) 8(2.7,1.905)
  silkscreen extent -3.45,-2.45 1.6,2.58, body extent -3,-2.45 3,2.45, height 1.75
SOIC8_127P600X175-8N [mm]
  rrect25% 1.71x0.61 smd paste+0 mask+0.05: 1(-2.605,1.905) 2(-2.605,0.635) 3(-2.605,-0.635) 4(-2.605,-1.905) 5(2.605,-1.905) 6(2.605,-0.635) 7(2.605,0.635) 8(2.605,1.905)
  silkscreen extent -4.41,-2.53 1.95,2.61, body extent -3,-2.45 3,2.45, height 1.75
SOIC8P127_490X600X175L70X41 [mm]
  rect 1.525x0.65 smd paste+0 mask+0.05: 1(-2.712,1.905) 2(-2.712,0.635) 3(-2.712,-0.635) 4(-2.712,-1.905) 5(2.712,-1.905) 6(2.712,-0.635) 7(2.712,0.635) 8(2.712,1.905)
  silkscreen extent -3.47,-2.45 1.6,2.58, body extent -3,-2.45 3,2.45, height 1.75
SOIC14P127_865X600X175L83X41 [mm]
  rect 1.55x0.65 smd paste+0 mask+0.05: 1(-2.725,3.81) 2(-2.725,2.54) 3(-2.725,1.27) 4(-2.725,0) 5(-2.725,-1.27) 6(-2.725,-2.54) 7(-2.725,-3.81) 8(2.725,-3.81) 9(2.725,-2.54) 10(2.725,-1.27) 11(2.725,0) 12(2.725,1.27) 13(2.725,2.54) 14(2.725,3.81)
  silkscreen extent -3.5,-4.33 1.6,4.48, body extent -3,-4.33 3,4.33, height 1.75
SOIC16_HX1188_PUL [mil]
  rect 67x14 smd paste+0 mask+1.97: 1(-175.5,175) 2(-175.5,125) 3(-175.5,75) 4(-175.5,25) 5(-175.5,-25) 6(-175.5,-75) 7(-175.5,-125) 8(-175.5,-175) 9(175.5,-175) 10(175.5,-125) 11(175.5,-75) 12(175.5,-25) 13(175.5,25) 14(175.5,75) 15(175.5,125) 16(175.5,175)
  silkscreen extent -184,-255 229,255, body extent -216,-250 216,250, height 236
SOP5P95_290X280X145L45X40 [mm]
  rect 1.25x0.6 smd paste+0 mask+0.05: 1(-1.25,0.95) 2(-1.25,0) 3(-1.25,-0.95) 4(1.25,-0.95) 5(1.25,0.95)
  silkscreen extent -1.88,-1.5 0.28,1.5, body extent -1.38,-1.5 1.38,1.5, height 1.1
SOT23-6 [mm]
  rect 0.3x0.99 smd paste+0 mask+0.05: 1(-0.5,-0.805) 2(0,-0.805) 3(0.5,-0.805) 4(0.5,0.805) 5(0,0.805) 6(-0.5,0.805)
  silkscreen extent -0.6,-1.65 -0.5,-1.55, body extent -0.75,-0.75 0.75,0.75, height 0.46
SOT23_PESD1_NEX [mm]
  rect 1.05x0.6 smd paste+0 mask+0.05: 1(-1.1,0.95) 2(-1.1,-0.95) 3(1.1,0)
  silkscreen extent -1.63,-1.45 0.23,1.5, body extent -1.2,-1.45 1.2,1.45, height 0.96
SOT-23-5_RIT [mm]
  rect 1.25x0.65 smd paste+0 mask+0.05: 1(-1.25,0.94) 2(-1.25,0) 3(-1.25,-0.94) 4(1.25,-0.94) 5(1.25,0.94)
  silkscreen extent -1.88,-1.45 0.28,1.51, body extent -1.4,-1.45 1.4,1.45, height 1.3
SOT-23_MCC [mm]
  rect 1x0.7 smd paste+0 mask+0.05: 1(-1.2,0.95) 2(-1.2,-0.95) 3(1.2,0)
  silkscreen extent -1.7,-1.46 0.35,1.55, body extent -1.2,-1.46 1.2,1.46, height 1.2
SPACER_139T [mil] "SPACER_139T"
  round 220 hole 139 mask+1.97: 1(0,0)
  BOTTOM region: 110.52,0 109.16,17.29 105.11,34.15 98.48,50.18 89.41,64.96 78.15,78.15 64.96,89.41 50.18,98.48 34.15,105.11 17.29,109.16 0,110.52 -17.29,109.16 -34.15,105.11 -50.18,98.48 -55.11,95.45 -55.11,95.45 -64.96,89.41 -78.15,78.15 -89.41,64.96 -98.48,50.18 -105.11,34.15 -109.16,17.29 -110.52,0 -109.16,-17.29 -105.11,-34.15 -98.48,-50.18 -89.41,-64.96 -78.15,-78.15 -64.96,-89.41 -55.11,-95.45 -55.11,-95.45 -50.18,-98.48 -34.15,-105.11 -17.29,-109.16 0,-110.52 17.29,-109.16 34.15,-105.11 50.18,-98.48 64.96,-89.41 78.15,-78.15 89.41,-64.96 98.48,-50.18 105.11,-34.15 109.16,-17.29 110.52,0
  silkscreen extent -117,-117 117,117, body extent -111,-111 111,111, height 150
XTAL_FC2012AN_EPS [mil]
  rect 46x39 smd paste+0 mask+1.97: 1(-25.5,0) 2(25.5,0)
  Keep-Out Layer region: -0.5,-21.5 -0.5,21.5 0.5,21.5 0.5,-21.5
  silkscreen extent -56,-36 56,36, body extent -47,-35 47,35, height 24

## Part data
B1: "BATT HLDR COIN 20MM 1 CEL PC PIN", Mfr_Name="ADAM TECHNOLOGIES INC", Battery Series=2032, Datasheet_URL=https://app.adam-tech.com/products/download/data_sheet/196965/bh-25e-1-data-sheet.pdf, DigiKey_URL=https://www.digikey.bg/en/products/detail/adam-tech/BH-25E-1/13537715, MPN=BH-25C-1
C1 C4 C10 C11 C12 C13 C14 C15 C25 C26 C28 C29 C30 C33 C64 C65 C72 C73 C74 C75 C76 C77 C78 C80 C81 C84 C85 C93 C94 C95 C96 C97: library part CMP-001-0374-4, "0402 25V X7R 100 NF 10%", Capacitance=0.1uF, Dielectric=X7R, MAnufacturer="KYOCERA AVX", Op Temp max=85°C, Op Temp min=-55°C, Package="0402 (1005 Metric)", Package1=0402, Ratings=-, Tolerance=10%, Voltage Rating=25V, Component Type="Ceramic Capacitor", ComponentLink1Description=Datasheet, ComponentLink1URL=https://www.yageo.com/upload/media/product/productsearch/datasheet/mlcc/UPY-GPHC_X5R_4V-to-50V_26.pdf, ComponentLink2Description=Mouser, ComponentLink2URL=https://eu.mouser.com/ProductDetail/YAGEO/CC0402MRX5R5BB106?qs=zEY9bCHj09eCmUJdZuS5Lg%3D%3D, ComponentLink3Description=Digikey, ComponentLink3URL=https://www.digikey.com/en/products/detail/yageo/CC0402MRX5R5BB106/5195138, Height max=700µm, Lead Spacing=0mm, Mounting type=SM, Size="1.00mm x 0.50mm"
  C1 C4 C10 C11 C12 C13 C14 C15 C25 C26 C28 C29 C30 C33 C64 C65 C72 C73 C74 C75 C76 C77 C78 C80 C81 C93 C94 C95 C96 C97: MPN=04023C104KAT2A
  C84 C85: DNP=DNP, MPN=DNP
C2 C3 C18 C19 C20 C21: library part CMP-001-1415-2, "CAP CER 10UF 25V X5R 0805", Capacitance="10 µF", Dielectric=X5R, MAnufacturer=YAGEO, Op Temp max=125°C, Op Temp min=-55°C, Package="0805 (2012 Metric)", Tolerance=±10%, Voltage Rating=25V, Component Type="Ceramic Capacitor", ComponentLink1Description=Datasheet, ComponentLink3Description=Digikey, Mounting type=SM, MPN=CC0805KKX5R8BB106, Size2=0805
  C2 C18 C20: ComponentLink1URL=https://www.yageo.com/upload/media/product/app/datasheet/mlcc/upy-gphc_x7r_6_3v-to-250v.pdf, ComponentLink3URL=https://www.digikey.ee/en/products/detail/yageo/cc0805krx7r9bb223/302872
  C3 C19 C21: ComponentLink1URL=https://www.yageo.com/upload/media/product/app/datasheet/mlcc/upy-gphc_x5r_4v-to-50v.pdf, ComponentLink3URL=https://www.digikey.com/en/products/detail/yageo/CC0805KKX5R8BB106/5195275
C5: library part CMP-001-0374-4, "CAP CER 22PF 50V C0G/NPO 0402", Capacitance=22pF, Dielectric="C0G, NP0", MAnufacturer=YAGEO, Op Temp max=125°C, Op Temp min=-55°C, Package="0402 (1005 Metric)", Package1=0402, Ratings=-, Tolerance=5%, Voltage Rating=50V, Component Type="Ceramic Capacitor", ComponentLink1Description=Datasheet, ComponentLink1URL=https://www.yageo.com/upload/media/product/productsearch/datasheet/mlcc/UPY-GP_NP0_16V-to-50V_18.pdf, ComponentLink3Description=Digikey, ComponentLink3URL=https://www.digikey.com/en/products/detail/yageo/CC0402JRNPO9BN220/302752, Height max=700µm, Lead Spacing=0mm, Mounting type=SM, MPN=CC0402JRNPO9BN220, Size="1.00mm x 0.50mm"
C6 C7: library part CMP-001-1415-2, "CAP CER 22UF 25V X5R 0805", Capacitance="22 µF", Dielectric=X5R, MAnufacturer=YAGEO, Op Temp max=125°C, Op Temp min=-55°C, Package="0805 (2012 Metric)", Tolerance=±20%, Voltage Rating=25V, Component Type="Ceramic Capacitor", ComponentLink1Description=Datasheet, ComponentLink1URL=https://search.murata.co.jp/Ceramy/image/img/A01X/G101/ENG/GRT21BR61E226ME13-01.pdf, ComponentLink3Description=Digikey, ComponentLink3URL=https://www.digikey.com/en/products/detail/murata-electronics/GRT21BR61E226ME13L/5416811, Mounting type=SM, MPN=GRT21BR61E226ME13L, Size2=0805
C8 C27: library part CMP-00119-5, "CAP CER 1UF 16V X5R 0603", Capacitance=1uF, Dielectric=X5R, MAnufacturer="KYOCERA AVX", Op Temp max=85°C, Op Temp min=-55°C, Package="0603 (1608 Metric)", Ratings=-, Tolerance=10%, Voltage Rating=16V, Component Type="Ceramic Capacitor", ComponentLink1Description=Datasheet, ComponentLink1URL=https://eu.mouser.com/datasheet/2/40/cx5r_KGM-3223198.pdf, ComponentLink2Description=Mouser, ComponentLink2URL=https://eu.mouser.com/ProductDetail/KYOCERA-AVX/0603YD105KAT2A?qs=Gc704lYbI0yxwip%252B5td8dA%3D%3D, Mounting type=SM, MPN=0603YD105KAT2A, Size="1.60mm x 0.80mm"
C9: library part CMP-001-1415-2, "CAP CER 0.022UF 50V X7R 0805", Capacitance=22nF, Dielectric=X7R, MAnufacturer="Samsung Electro-Mechanics", MPN=CL21B104KBCNNNC, Op Temp max=125°C, Op Temp min=-55°C, Package="0805 (2012 Metric)", Ratings=-, Tolerance=±10%, Voltage Rating=50V, Component Type="Ceramic Capacitor", ComponentLink1Description=Datasheet, ComponentLink1URL=https://www.yageo.com/upload/media/product/app/datasheet/mlcc/upy-gphc_x7r_6_3v-to-250v.pdf, ComponentLink3Description=Digikey, ComponentLink3URL=https://www.digikey.ee/en/products/detail/yageo/cc0805krx7r9bb223/302872, Mounting type=SM, Size2=0805
C16 C17: library part CMP-00119-5, "CAP CER 1UF 16V X7R 0603", Capacitance=1uF, Dielectric=X7R, MAnufacturer="KYOCERA AVX", Op Temp max=125°C, Op Temp min=-55°C, Package="0603 (1608 Metric)", Ratings=-, Tolerance=10%, Voltage Rating=16V, Component Type="Ceramic Capacitor", ComponentLink1Description=Datasheet, ComponentLink1URL=https://datasheets.kyocera-avx.com/KGM_X7R.pdf, ComponentLink3Description=Digikey, ComponentLink3URL=https://www.digikey.ee/en/products/detail/kyocera-avx/kgm15ar71c105kt/10815111, Height max=900µm, Lead Spacing=0mm, Mounting type=SM, MPN=KGM15AR71C105KT, Size="1.60mm x 0.80mm", Size2=0603
C22 C23 C24: library part CAP_1206, "CAP CER 1206 10NF 200V X7R 10%", Capacitance=0.01µF, Dielectric=X7R, MAnufacturer=YAGEO, Op Temp max=85°C, Op Temp min=-55°C, Package="1206 (3216 Metric)", Ratings=-, Tolerance=10%, Voltage Rating=200V, Component Type="Ceramic Capacitor", ComponentLink1Description=Datasheet, ComponentLink1URL=https://connect.kemet.com:7667/gateway/IntelliData-ComponentDocumentation/1.0/download/datasheet/C1206C104K2REC7210, ComponentLink3Description=Digikey, ComponentLink3URL=https://www.digikey.com/en/products/detail/kemet/C1206C104K2REC7210/8645679, Height max=700µm, Lead Spacing=0mm, Mounting type=SM, MPN=C1206C103K2REC7800, Size="3.20mm x 1.60mm"
C31 C32: library part CMP-001-0374-4, "CAP CER 12PF 50V C0G/NP0 0402", Capacitance=12p, Dielectric="C0G, NP0", MAnufacturer=KEMET, Op Temp max=55°C, Op Temp min=-125°C, Package="0402 (1005 Metric)", Package1=0402, Ratings=-, Tolerance=±1%, Voltage Rating=50V, Component Type="Ceramic Capacitor", ComponentLink1Description=Datasheet, ComponentLink3Description=Digikey, DNP=DNP, Height max=700µm, Lead Spacing=0mm, Mounting type=SM, MPN=CBR04C120F5GAC, Size="1.00mm x 0.50mm"
  C31: ComponentLink1URL=https://connect.kemet.com:7667/gateway/IntelliData-ComponentDocumentation/1.0/download/datasheet/CBR04C120F5GAC, ComponentLink3URL=https://www.digikey.ee/en/products/detail/kemet/CBR04C949B5GAC/7649438?s=N4IgTCBcDaIMICEBKAGALHAnGzCCsA4gIJwgC6AvkA
  C32: ComponentLink1URL=https://www.yageo.com/upload/media/product/productsearch/datasheet/mlcc/UPY-GPHC_X5R_4V-to-50V_26.pdf, ComponentLink2Description=Mouser, ComponentLink2URL=https://eu.mouser.com/ProductDetail/YAGEO/CC0402MRX5R5BB106?qs=zEY9bCHj09eCmUJdZuS5Lg%3D%3D, ComponentLink3URL=https://www.digikey.com/en/products/detail/yageo/CC0402MRX5R5BB106/5195138
C66: library part CMP-001-1415-2, "CAP CER ???? 50V X7R 0805", Capacitance=DNP, Dielectric=X7R, MAnufacturer="Samsung Electro-Mechanics", Op Temp max=125°C, Op Temp min=-55°C, Package="0805 (2012 Metric)", Tolerance=±10%, Voltage Rating=50V, Component Type="Ceramic Capacitor", ComponentLink1Description=Datasheet, ComponentLink1URL=https://www.yageo.com/upload/media/product/app/datasheet/mlcc/upy-gphc_x7r_6_3v-to-250v.pdf, ComponentLink3Description=Digikey, ComponentLink3URL=https://www.digikey.ee/en/products/detail/yageo/cc0805krx7r9bb223/302872, DNP=DNP, Mounting type=SM, Size2=0805
C67 C68 C69 C70 C71: library part CMP-001-0374-4, "CAP CER 1UF 16V X5R 0402", Capacitance=1µF, Dielectric=X5R, MAnufacturer=YAGEO, Op Temp max=85°C, Op Temp min=-55°C, Package="0402 (1005 Metric)", Ratings=-, Tolerance=10%, Voltage Rating=16V, Component Type="Ceramic Capacitor", ComponentLink1Description=Datasheet, ComponentLink1URL=https://www.yageo.com/upload/media/product/productsearch/datasheet/mlcc/UPY-GPHC_X5R_4V-to-50V_26.pdf, ComponentLink2Description=Mouser, Height max=700µm, Lead Spacing=0mm, Mounting type=SM, MPN=CC0402KPX5R7BB105, Size="1.00mm x 0.50mm"
  C67 C68 C69 C71: ComponentLink2URL=https://eu.mouser.com/ProductDetail/YAGEO/CC0402MRX5R5BB106?qs=zEY9bCHj09eCmUJdZuS5Lg%3D%3D, ComponentLink3Description=Digikey, ComponentLink3URL=https://www.digikey.com/en/products/detail/yageo/CC0402MRX5R5BB106/5195138
  C70: ComponentLink2URL=https://eu.mouser.com/ProductDetail/YAGEO/CC0402KPX5R7BB105?qs=W0yvOO0ixfFHgNkeru%2FKgA%3D%3D
C79: library part CMP-001-1415-2, "CAP SMD 0805 X5R 10UF 10% 25V", Capacitance=10uF, Dielectric=X7R, Op Temp max=125°C, Op Temp min=-55°C, Package="0805 (2012 Metric)", Tolerance=±10%, Voltage Rating=25V, Component Type="Ceramic Capacitor", ComponentLink1Description=Datasheet, ComponentLink1URL=https://mm.digikey.com/Volume0/opasdata/d220001/medias/docus/5660/3372_0805W106K250CC.pdf, ComponentLink3Description=Digikey, ComponentLink3URL=https://www.digikey.com/en/products/detail/nextgen-components/0805W106K250CC/18676983, Mounting type=SM, MPN=0805W106K250CC
D9 D10 D11 D12: "TVS DIODE 3.3VWM 14.1VC SOD523", Capacitance @ Frequency="105pF @ 1MHz", MPN=ESD5Z3.3T1G/T5G, Package="SC-79, SOD-523", Temperature MAX=150°C, Temperature MIN=-55°C, Voltage - Breakdown (Min)=5V, Voltage - Clamping (Max) @ Ipp=14.1V, Voltage - Reverse Standoff (Typ)="3.3V (Max)", ComponentLink1Description=Datasheet, ComponentLink1URL=https://www.onsemi.com/pdf/datasheet/esd5z2.5t1-d.pdf, ComponentLink2Description=DigiKey, ComponentLink2URL=https://www.digikey.com/en/products/detail/onsemi/esd5z3-3t1/1476606, Type=Zener
D20 D21: library part SMAJ*C, "TVS DIODE 14VWM 23.2VC SMA", MPN=SMAJ14CA-13-F
D22: "DIODE GEN PURP 1KV 1A DO214AC", Capacitance="15pF @ 4V, 1MHz", Current - Average Rectified (Io)=1A, MAnufacturer="Micro Commercial Co", Package="DO-214AC, SMA", Voltage - DC Reverse (Vr) (Max)="1000 V", Voltage - Forward (Vf) (Max) @ If="1.1 V @ 1 A", ComponentLink1Description=Datasheet, ComponentLink1URL=https://www.smc-diodes.com/propdf/1N4001FL-1N4007FL%20N1646%20REV.A.pdf, ComponentLink3Description=Digikey, ComponentLink3URL=https://www.digikey.com/en/products/detail/micro-commercial-co/GS1M-LTP/2213582, Diode Type=Diode, Mounting type=SM, MPN=GS1M-LTP
D23 D24: library part "ESD_Diode 0603", "TVS DEVICE 60V 0603", Capacitance=10pF, MAnufacturer="Würth Elektronik", Op Temp max=+85°C, Op Temp min=-45°C, Package=0603, Voltage - DC max=60V, Working Voltage="12 V", ComponentLink1Description=Datasheet, ComponentLink1URL=https://www.we-online.com/components/products/datasheet/82356120100.pdf, ComponentLink3Description=Digikey, ComponentLink3URL=https://www.digikey.com/en/products/detail/w%C3%BCrth-elektronik/82356120100/9817490, Diode Type=TVS, Height max=0.9mm, Mounting type=SM, MPN=82356120100, Size="1.6mm x 0.8mm"
D25 D26: library part ESD5Z3.3T1, "TVS DIODE 3.3VWM 14.1VC SOD523", Capacitance @ Frequency="105pF @ 1MHz", MPN=ESD5Z3.3T1G/T5G, Package="SC-79, SOD-523", Temperature MAX=150°C, Temperature MIN=-55°C, Voltage - Breakdown (Min)=5V, Voltage - Clamping (Max) @ Ipp=14.1V, Voltage - Reverse Standoff (Typ)="3.3V (Max)", ComponentLink1Description=Datasheet, ComponentLink1URL=https://www.onsemi.com/pdf/datasheet/esd5z2.5t1-d.pdf, ComponentLink2Description=DigiKey, ComponentLink2URL=https://www.digikey.com/en/products/detail/onsemi/esd5z3-3t1/1476606, Type=Zener
D27 D28 D29 D30 D31 D32 D33 D34: library part 7SEG_Houkem-15012-BSRSG, "7 segment indicator", MPN=Houkem-15012-BSRSG
F1 F3: "PTC RESET FUSE 16V 2A 1812", Current - Hold (Ih) (Max)="2 A", Current - Trip (It)=3.5A, Mfr_Name=Belfuse, Resistance - Initial (Ri) (Min)="20 mOhms", Voltage - Max=16V, ComponentLink1Description=DigiKey, ComponentLink1URL=https://www.digikey.pl/en/products/detail/bel-fuse-inc/0ZCG0200AF2B/6210545, ComponentLink2Description=Datasheet, ComponentLink2URL=https://www.belfuse.com/resources/datasheets/circuitprotection/ds-cp-0zcg-series.pdf, MPN=0ZCG0200AF2B
J1: library part Con_533980571, "CONN HEADER SMD 5POS 1.25MM", Mfr_Name="Molex Connector Corporation", ComponentLink1Description=DigiKey, ComponentLink1URL=https://www.digikey.ee/en/products/detail/molex/0533980571/699069?s=N4IgTCBcDaIKwGYEE4AcAGOB2AjCAugL5A, ComponentLink2Description=MN, ComponentLink2URL=https://www.molex.com/en-us/products/part-detail/533980571, ComponentLink3Description=Datasheet, ComponentLink3URL=https://tools.molex.com/pdm_docs/sd/533980571_sd.pdf, Manufacturer_Part_Number=533980571, Positions=5
J2 J11: library part PLS_02, "CONN HEADER VERT 2POS 2.54MM", MAnufacturer=MOLEX, MPN=0022285024